# Altium PCB USB-PD-240W-PCB.PcbDoc (part 2 of 3)
Units mil, origin at the board's own origin, x right, y up, seen from the top; angles counter-clockwise.
Board outline 3858.27 x 2834.65 mil, 6 copper layers (L1 Top, L2 GND, L3 Power, L4 Power, L5 GND, L6 Bottom), stack 61.496 mil thick; 154 components, 83 nets, 633 pads, 831 vias.
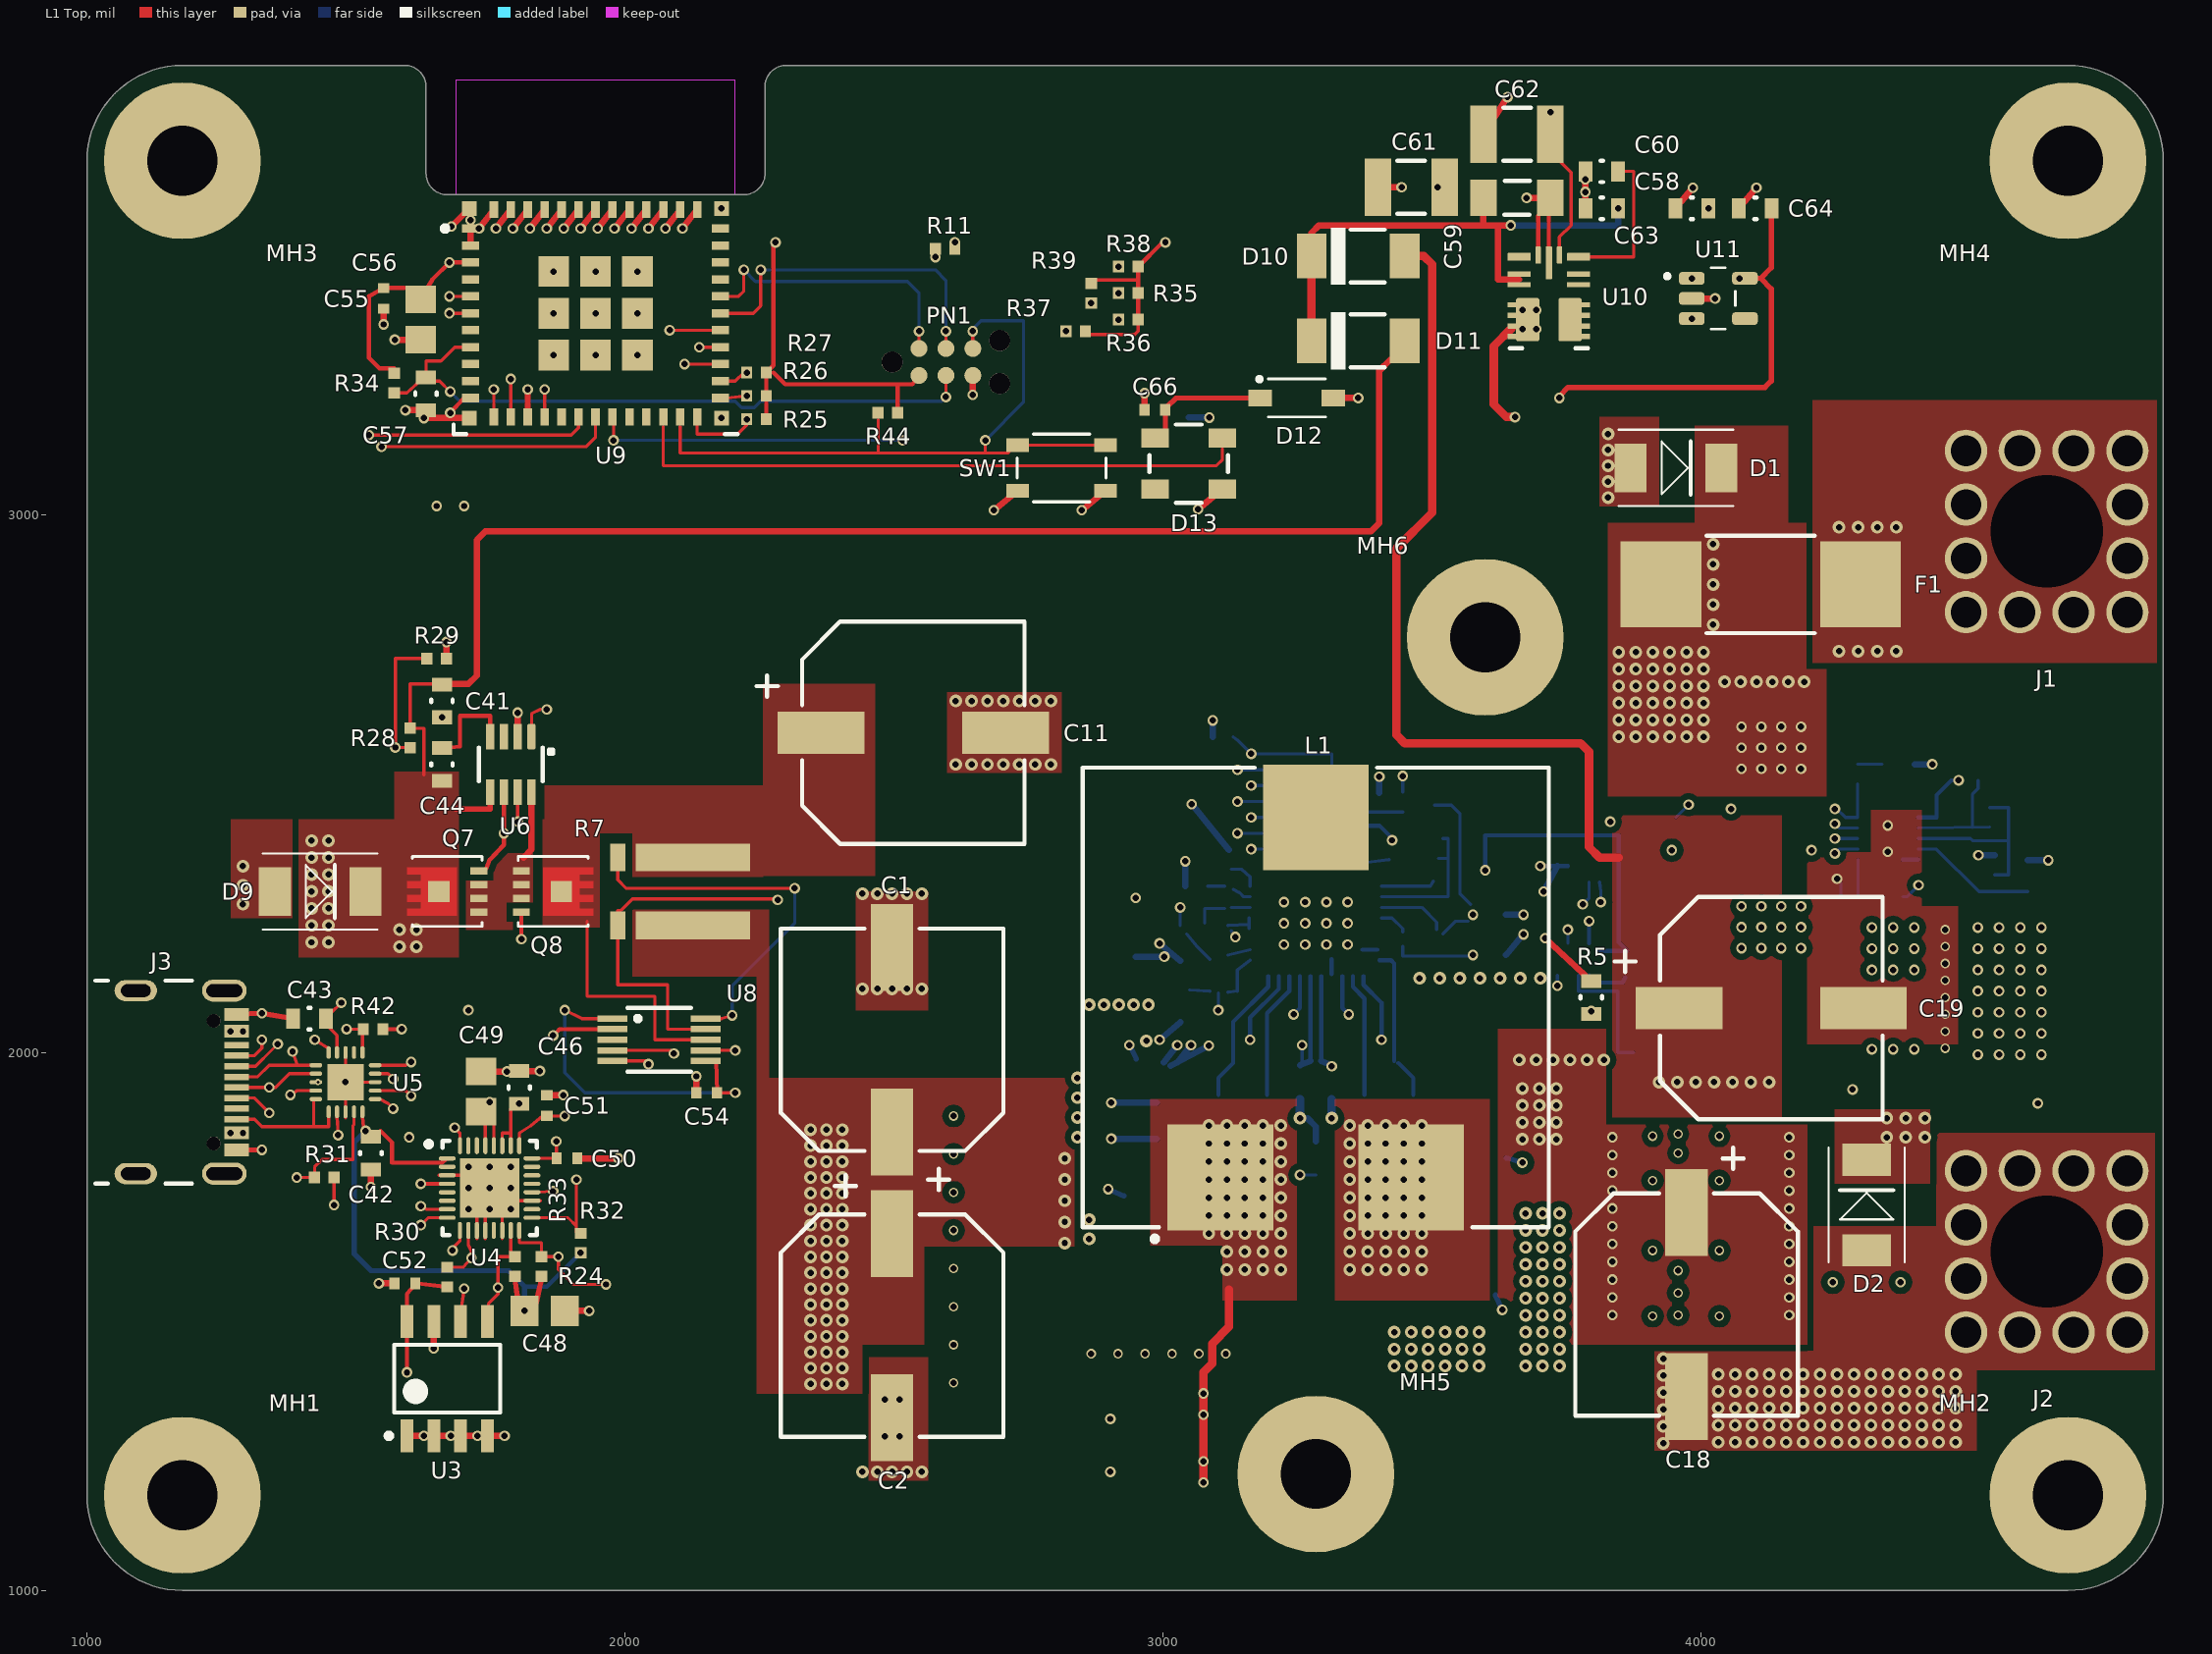
[diagram p0: L1 Top view]

## Part data (continued)
U11: "IC REG LINEAR 3.3V 600MA SOT25", Manufacturer 1="Diodes Incorporated", Package / Case="SC-74A, SOT-753", Supplier Device Package=SOT-25, Supplier Part Number 1=AP2112K-3.3TRG1DICT-ND, AEC-Q200=False, Function=-, Manufacturer Part Number 1=AP2112K-3.3TRG1, Part Name=AP2112K-3.3TRG1, Supplier 1=Digi-Key

## Via types
v1: diameter 23.62, hole 11.81, L1 Top to L6 Bottom, tented both sides, 435 vias
v2: diameter 19.68, hole 11.81, L1 Top to L6 Bottom, tented both sides, 351 vias
v3: diameter 17.72, hole 11.81, L1 Top to L6 Bottom, tented both sides, 35 vias
v4: diameter 23.62, hole 11.81, L1 Top to L6 Bottom, 9 vias
v5: diameter 11.81, hole 5.91, L1 Top to L6 Bottom, tented both sides, 1 vias

## Nets (pads, with @x,y where several pads share a name; then routed paths per layer and width w, separated by ;. In a path a pad name is that pad's centre, name@x,y a point inside that pad or via, vN(x,y) a via of type N, cw(c..) or ccw(c..) an arc to the next point about the centre after c; other vN are vias at no path point)
+3V3: C47.2 C52.2 C53.2 C54.2 C55.2 C56.2 C64.2 PN1.1 R11.2 R25.2 R26.2 R27.2 R30.2 R31.2 R34.2 R35.2 R36.2 R37.2 R38.2 R39.2 R44.2 U3.8 U4.32 U7.6 U8.1 U8.6 U9.3 U11.5 | length 9928.7
  L1 Top w5.91: v2(1459.06,1716.54) R31.2@1459.06,1767.72 ; v2(1683.07,1860.24) 1692.91,1850.39 U4.32@1692.91,1838.58 ; v2(1887.8,2078.74) 1919.29,2062.99 U8.1@1976.38,2062.99 ; C54.2@2170.87,1925.2 v2(2204.72,1925.2) ; R37.2@2855.51,3340.55 2862.2,3334.65 2946.85,3334.65 2953.15,3340.94 R36.2@2953.15,3362.2 ; R39.2@2866.14,3429.53 2872.64,3436.02 2953.15,3436.02
  L1 Top w7.87: R34.2@1570.87,3271.65 1543.31,3271.65 1523.62,3291.34 1523.62,3405.51 1551.18,3421.26 1589.37,3421.26 ; v2(1594.49,1405.51) U3.8@1594.49,1500 ; U3.8@1594.49,1527.56 1594.49,1551.18 C52.2@1608.27,1566.93 ; C52.2@1614.17,1570.87 R30.2@1663.39,1564.57 ; C56.2@1629.92,3417.32 1641.73,3437.01 v2(1673.23,3468.5) U9.3@1712.6,3468.5 ; U8.6@2169.29,1984.25 C54.2@2170.87,1925.2 ; R25.2@2262.2,3177.17 2262.2,3263.78 2275.59,3277.17 2275.59,3501.97 v2(2279.53,3505.91) ; 2275.59,3263.78 2297.24,3242.13 2533.46,3242.13 PN1.1@2546.06,3254.72 ; 2506.3,3200.79 2506.3,3242.13 ; R36.2@2953.15,3362.2 2953.15,3460.63 2998.43,3505.91 v2(3003.94,3505.91)
  L1 Top w9.84: v2@3736.22,3220.47 3751.97,3236.22 4118.11,3236.22 4129.92,3248.03 4129.92,3419.29 4110.24,3438.98 ; U11.5@4080.71,3438.98 4110.24,3438.98 ; C64.2@4129.92,3555.12 4129.92,3458.66 4110.24,3438.98
  L3 Power w5.91: v2(1459.06,1716.54) 1459.06,1418.9 1472.44,1405.51 v2(1594.49,1405.51) 1594.49,1452.76 1625.98,1484.25 1649.61,1484.25 1649.61,1635.83 1683.07,1669.29 v2(1683.07,1860.24) ; v2(1708.66,2078.74) v2(1887.8,2078.74) ; v2(3598.43,2338.58) 3598.43,2358.27 3610.24,2370.08 3770.67,2370.08 3784.45,2383.86 3784.45,3168.31 v2(3736.22,3216.54)
  L3 Power w9.84: v2(1649.61,3015.75) 1649.61,3444.88 v2(1673.23,3468.5)
  L4 Power w9.84: v2(1649.61,3015.75) 1708.66,2956.69 1708.66,1885.83 v2(1683.07,1860.24)
  L4 Power w11.81: v2(1673.23,3468.5) 1673.23,3486.22 1692.91,3505.91 4003.94,3505.91 v2(4070.87,3438.98)
  L6 Bottom w5.91: v2(1887.8,2078.74) 1887.8,1962.6 1925.2,1925.2 v2(2204.72,1925.2)
  L6 Bottom w7.87: v2(3598.43,2338.58) 3598.43,2403.54 3846.46,2403.54 3846.46,2204.72 3862.2,2188.98 U7.6@3811.02,2188.98
  other v2: 2612.6,3505.91
+5V: C37.2 C49.2 C61.2 C62.2 C63.2 D12.A U2.23 U4.28 U4.29 U10.4 U10.9 U11.1 U11.3 | length 7074.6
  L1 Top w5.91: U4.29@1740.16,1838.58 C49.2@1740.16,1866.14 ; U4.28@1755.91,1838.58 C49.2@1755.91,1866.14 ; C62.2@3732.28,3661.42 3757.87,3635.83 3757.87,3537.4 3736.22,3515.75 U10.9@3736.22,3482.28
  L1 Top w11.81: D12.A@3322.83,3216.54 v2(3362.2,3216.54)
  L1 Top w15.75: U10.4@3647.64,3346.46 3614.17,3312.99 3614.17,3204.72 3637.8,3181.1 v2(3653.54,3181.1)
  L3 Power w11.81: v2(1700.79,3015.75) 1700.79,3505.91 2208.66,3505.91 2240.16,3537.4 3509.84,3537.4
  L3 Power w19.68: v2(3509.84,3608.27) 3509.84,3537.4 3555.12,3492.13 v2(3667.32,3379.92) ; v2(3719.68,3748.03) 3751.97,3716.54 3751.97,3438.98 v2(3692.91,3379.92) ; v2(4012.99,3568.9) 4012.99,3469.68 v2(3982.28,3438.98) 3982.28,3334.65 3702.76,3334.65 v2(3692.91,3344.49) ; v2(3667.32,3379.92) v2(3667.32,3344.49) v2(3692.91,3344.49) ; v2(3667.32,3379.92) v2(3692.91,3379.92) ; v2(3692.91,3344.49) v2(3692.91,3379.92)
  L4 Power w11.81: v2(1700.79,3015.75) 1748.03,2968.5 v2(1748.03,1907.48) ; v2(3312.99,1974.41) 3344.49,1974.41 3377.95,2007.87 3377.95,2287.4 3346.46,2318.9 3346.46,2555.12 3377.95,2586.61 3377.95,3181.1 ; v2(3362.2,3216.54) 3377.95,3200.79 3377.95,3181.1 ; v2(3653.54,3181.1) 3377.95,3181.1
  L6 Bottom w7.87: 3293.31,1984.25 U2.23@3293.31,2141.73
  L6 Bottom w11.81: 3293.31,1984.25 C37.2@3312.99,1976.38
  other v2: 3982.28,3364.17
+V_BATT: F1.1 J1.1
  other v1: 4255.91,2746.06 4291.34,2746.06 4326.77,2746.06 4362.2,2746.06 4255.91,2976.38 4291.34,2976.38 4326.77,2976.38 4362.2,2976.38
AUX_VCC: C60.2 U10.8 | length 289.8
  L1 Top w5.91: U10.8@3771.65,3478.74 3874.02,3478.74 3874.02,3637.8 C60.2@3845.67,3637.8
BAT_SENSE: Q2.D R1.1
  other v2: 4316.93,2005.91 4356.3,2005.91 4395.67,2005.91 4316.93,2153.54 4356.3,2153.54 4395.67,2153.54 4316.93,2192.91 4356.3,2192.91 4395.67,2192.91 4074.57,2193.9 4111.46,2193.9 4148.39,2193.9 4185.28,2193.9 4316.93,2232.28 4356.3,2232.28 4395.67,2232.28 4074.57,2232.87 4111.46,2232.87 4148.39,2232.87 4185.28,2232.87 4074.57,2271.85 4111.46,2271.85 4148.39,2271.85 4185.28,2271.85
BAT_SRC: Q1.S Q2.S
BQ_ACN: C30.2 C33.1 R7.3 U2.29 U8.9 | length 1968.6
  L1 Top w5.91: U8.9@2149.61,2043.31 2078.74,2043.31 2078.74,2125.98 1986.22,2125.98 R7.3@1986.22,2236.22 1986.22,2263.78 1992.13,2263.78 2013.78,2285.43 2281.5,2285.43 v2(2283.46,2283.46)
  L4 Power w5.91: v2(2283.46,2283.46) 2283.46,2332.68 3102.36,2332.68 v2(3102.36,2078.74)
  L6 Bottom w5.91: C30.2@3049.21,2116.14 C33.1@3086.61,2114.17 ; v2(3102.36,2078.74) C33.1@3102.36,2110.24 ; C33.1@3120.08,2112.2 3137.8,2114.17 3137.8,2153.54 U2.29@3161.42,2171.26
BQ_ACOV: R14.1 R15.2 U2.35 | length 67.6
  L6 Bottom w5.91: R15.2@3082.68,2309.06 R14.1@3114.17,2309.06 ; R14.1@3129.92,2303.15 3141.73,2297.24 3149.61,2289.37 U2.35@3161.42,2289.37
BQ_ACP: C29.2 C33.2 R7.4 U2.30 U8.10 | length 1622.6
  L1 Top w5.91: R7.4@1986.22,2362.2 1986.22,2320.87 2001.97,2305.12 v2(2314.96,2305.12) ; U8.10@2149.61,2062.99 2179.13,2062.99 v2(2198.82,2068.9)
  L4 Power w5.91: v2(2314.96,2305.12) 2328.74,2318.9 3031.5,2318.9 v2(3031.5,2269.68)
  L6 Bottom w5.91: v2(2198.82,2068.9) 2198.82,2124.02 2314.96,2240.16 v2(2314.96,2305.12) ; C29.2@3031.5,2236.22 v2(3031.5,2269.68) ; C29.2@3043.31,2220.47 3062.99,2196.85 C33.2@3086.61,2173.23 ; C33.2@3120.08,2181.1 U2.30@3161.42,2190.94
BQ_ACUV: R13.1 R14.2 U2.34 | length 100.4
  L6 Bottom w5.91: R13.1@3076.77,2240.16 3076.77,2267.72 R14.2@3114.17,2267.72 ; R14.2@3125.98,2269.68 U2.34@3161.42,2269.68
BQ_BTST1: C38.2 D3.K U2.26 | length 237.6
  L6 Bottom w7.87: D3.K@3192.91,1921.26 3192.91,2072.83 3234.25,2114.17 U2.26@3234.25,2141.73
BQ_BTST2: C39.2 D4.K U2.20 | length 229.4
  L6 Bottom w7.87: U2.20@3352.36,2141.73 3352.36,2122.05 3374.02,2100.39 D4.K@3374.02,1921.26
BQ_CE: R21.2 U2.7 U9.19 | length 1870.1
  L1 Top w5.91: v2(1978.35,3137.8) U9.19@1978.35,3173.23
  L4 Power w5.91: v2(2515.75,3137.8) 3098.43,2555.12 v2(3163.39,2555.12)
  L6 Bottom w5.91: v2(1978.35,3137.8) v2(2515.75,3137.8) ; R21.2@3129.92,2586.61 3137.8,2580.71 v2(3163.39,2555.12) 3312.99,2555.12 U2.7@3312.99,2342.52
BQ_FB: R22.1 R23.2 U2.12 | length 259.8
  L6 Bottom w5.91: U2.12@3405.51,2289.37 3529.53,2289.37 3529.53,2397.64 R22.1@3519.68,2397.64 ; R23.2@3511.81,2360.63 3529.53,2360.63
BQ_FBG: R23.1 U2.11 | length 102
  L6 Bottom w5.91: U2.11@3405.51,2309.06 3496.06,2309.06 R23.1@3501.97,2318.9
BQ_FSW: R16.2 U2.36 | length 58.3
  L6 Bottom w5.91: R16.2@3125.98,2340.55 3145.67,2340.55 3161.42,2326.77 U2.36@3161.42,2309.06

## Text inside footprints (layer, text, board x,y; h text height)
J1: Mechanical 7 "Copper 25um-60um" at 4511.81,2724.41 h31.5; Mechanical 7 "Sn 15um max." at 4551.18,2751.97 h31.5
J2: Mechanical 7 "Copper 25um-60um" at 4511.81,1385.83 h31.5; Mechanical 7 "Sn 15um max." at 4551.18,1413.39 h31.5
J3: Top 3D Body "PCB EDGE" at 992.13,1732.28 h16 r270
U1: Mechanical 19 "Thermal Vias" at 4393.7,2448.82 h9.84